# Altium PCB PWM.PcbDoc
Units mil, origin at the board's own origin, x right, y up, seen from the top; angles counter-clockwise.
Board outline 6000 x 4000 mil, 2 copper layers (Top Layer, Bottom Layer); 14 components, 11 nets, 35 pads, 1 vias.
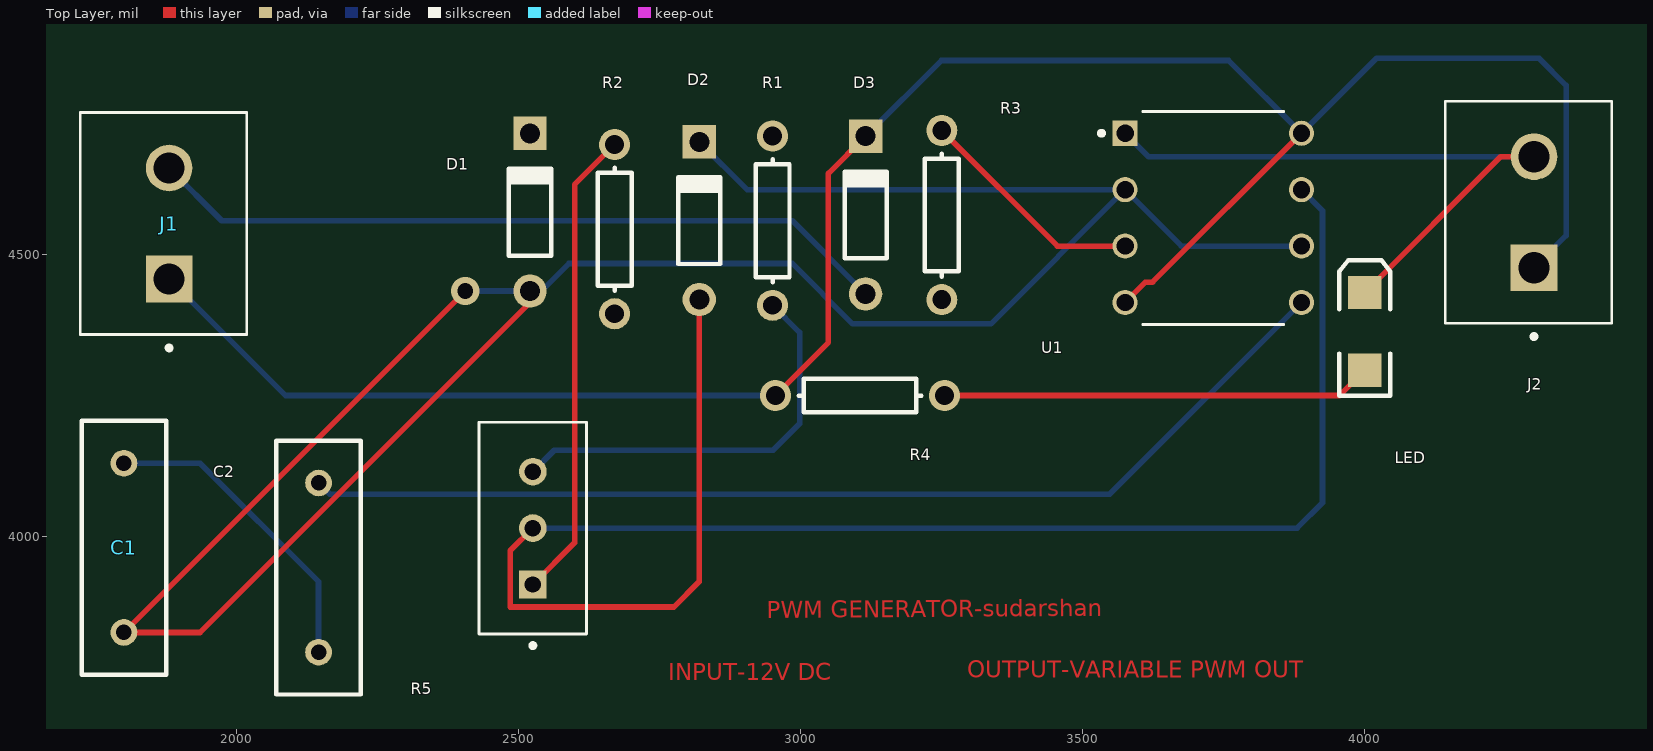
[diagram p0: Top Layer view]
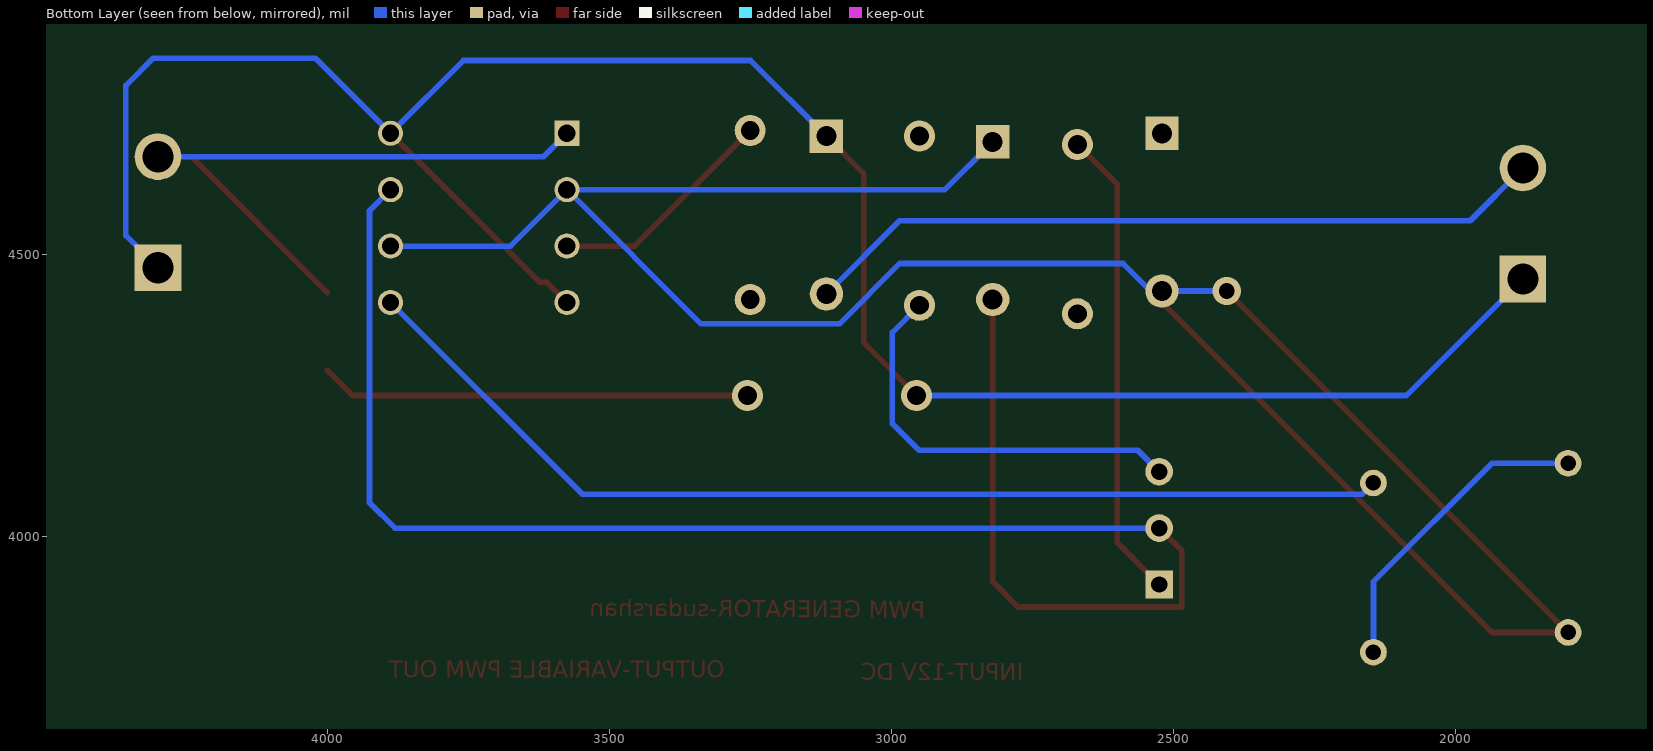
[diagram p1: Bottom Layer view, seen from below]

## Layer stack, top to bottom
Top Solder: solder mask 0.4, Solder Resist, Dk 3.5
Top Layer: signal copper 1.4
Dielectric 1: dielectric 12.6, FR-4, Dk 4.8
Bottom Layer: signal copper 1.4
Bottom Solder: solder mask 0.4, Solder Resist, Dk 3.5

## Board outline
1000,1000 7000,1000 7000,5000 1000,5000

## Design rules (kind name [scope] priority, off if disabled: settings)
Clearance [All] p1: gap=10 ignorepadtopadclearanceinfootprint=FALSE except(0: Arc-Hole Track-Hole SMDPad-Hole THPad-Hole Via-Hole Fill-Hole Poly-Hole Region-Hole Text-Hole)
PolygonConnect [All] p1: connectstyle=Relief reliefconductorwidth=10 reliefentries=4 polygonreliefangle="90 Angle" airgapwidth=10
RoutingVias [All] p1: holewidth=28 width=50 viastyle="Through Hole" minholewidth=28 minwidth=50 maxholewidth=28 maxwidth=50
SilkToSolderMaskClearance [IsPad] p1: minsilkscreentomaskgap=5 clearancetoexposedcopper=TRUE
SolderMaskExpansion [All] p1: expansion=4 istentingtop=FALSE
Width [All] p1: maxlimit=10 minlimit=10 preferedwidth=10
29 further rules are at their usual default settings.

## Components (designator, comment, footprint, x,y, rotation, side; value= is the part's Value field where it differs from the comment)
C1 "Cap" RAD-0.3 1800,3980 r90 top value=47NF
C2 "Cap" RAD-0.3 2145,3945 r90 top value=10UF
D1 "Diode 1N4148" DO-35 2520,4575 r90 top
D2 "Diode 1N4148" DO-35 2820,4560 r90 top
D3 "Diode 1N4148" DO-35 3115,4570 r90 top
J1 "KF301-2P" HANDSON_KF301-2P 1880,4555 r90 top
J2 "KF301-2P" HANDSON_KF301-2P 4300,4575 r90 top
LED "LED2" 3.2X1.6X1.1 4000,4363.9 r90 top
R1 "Res1" AXIAL-0.3 2950,4560 r90 top value=10K
R2 "Res1" AXIAL-0.3 2670,4545 r90 top value=10K
R3 "Res1" AXIAL-0.3 3250,4570 r90 top value=100
R4 "Res1" AXIAL-0.3 3105,4250 r180 top value=2.2K
R5 "3296-W" TRIM_3296-W 2525,3915 r90 top
U1 "NE555P" DIP794W45P254L959H508Q8 3731.3,4565 r0 top

## Footprints (in the part's own frame and the unit in brackets; to place one, negate y for a bottom-side part, rotate by r counter-clockwise, add the part's x,y. Pads: shape width x height; smd on the part's side, far side on the other; paste and mask are expansions set on the pad)
3.2X1.6X1.1 [mm] "SMT LED; 2 Flat Leads"
  rect 1.5x1.5 smd: 1(-1.75,0) 2(1.75,0)
  silkscreen extent -2.9,-1.15 3.2,1.15
AXIAL-0.3 [mm] "Axial Device, Thru-Hole; 2 Leads; 0.3 in Pin Spacing"
  round 1.4 hole 0.85: 1(-3.81,0) 2(3.81,0)
  silkscreen extent -2.77,-0.76 2.77,0.76
DIP794W45P254L959H508Q8 [mm]
  rect 1.13x1.13 / inner round 1.13 / far side rect 1.13x1.13 hole 0.78 mask+0.102: 1(-3.97,3.81)
  round 1.13 hole 0.78 mask+0.102: 2(-3.97,1.27) 3(-3.97,-1.27) 4(-3.97,-3.81) 5(3.97,-3.81) 6(3.97,-1.27) 7(3.97,1.27) 8(3.97,3.81)
  silkscreen extent -5.13,-4.8 3.18,4.8, body extent -4.1,-4.79 4.1,4.79, height 5.08
DO-35 [mm] "Diode, Axial; Body 3.8 x 1.9 mm (LxDia. max), Lead Dia. 0.53 mm (max)"
  round 1.5 hole 0.9: 1(-3.55,0)
  rect 1.5x1.5 hole 0.9: 2(3.55,0)
  silkscreen extent -1.95,-0.95 2.05,0.95
HANDSON_KF301-2P [mm]
  rect 2.1x2.1 / inner round 2.1 / far side rect 2.1x2.1 hole 1.4: 1(-2.5,0)
  round 2.1 hole 1.4: 2(2.5,0)
  silkscreen extent -5.7,-3.5 5,4, body extent -5.6,-3.75 5,3.75, height 10
RAD-0.3 [mm] "Radial Cap, Thru-Hole; 2 Leads; 0.3 in Pin Spacing"
  round 1.2 hole 0.7: 1(-3.81,0) 2(3.81,0)
  silkscreen extent -5.71,-1.91 5.71,1.91
TRIM_3296-W [mm]
  rect 1.248x1.248 / inner round 1.248 / far side rect 1.248x1.248 hole 0.74: 1(0,0)
  round 1.248 hole 0.74: 2(2.54,0) 3(5.08,0)
  silkscreen extent -2.85,-2.41 7.3,2.42, body extent -4.76,-2.41 4.76,2.42, height 11.55

## Part data
C1 C2: "Capacitor", LatestRevisionDate=17-Jul-2002, LatestRevisionNote="Re-released for DXP Platform.", PackageDescription="Radial Cap, Thru-Hole; 2 Leads; 0.3 in Pin Spacing", PackageReference=RAD-0.3, Published=8-Jun-2000, Publisher="Altium Limited"
D1 D2 D3: "High Conductance Fast Diode", Code_JEDEC=DO-204-AH, ComponentLink1Description="Manufacturer Link", ComponentLink1URL=http://www.fairchildsemi.com/, ComponentLink2Description=Datasheet, ComponentLink2URL=http://www.fairchildsemi.com/ds/1N%2F1N4148.pdf, DatasheetVersion=1997, LatestRevisionDate=17-Jul-2002, LatestRevisionNote="Re-released for DXP Platform.", PackageDescription="Diode, Axial; Body 3.8 x 1.9 mm (LxDia. max), Lead Dia. 0.53 mm (max)", PackageReference=DO-35, Published=8-Jun-2000, Publisher="Altium Limited"
J1 J2: "2 Pin Terminal Block 5mm Pitch", Package=None, Check_prices=https://www.snapeda.com/parts/KF301-2P/Handson+Technology/view-part/?ref=eda, MF="Handson Technology", MP=KF301-2P, SnapEDA_Link=https://www.snapeda.com/parts/KF301-2P/Handson+Technology/view-part/?ref=snap
LED: "Typical RED, GREEN, YELLOW, AMBER GaAs LED", LatestRevisionDate=17-Jul-2002, LatestRevisionNote="Re-released for DXP Platform.", PackageDescription="SM LED; 2 Flat Leads", PackageReference=3.2X1.6X1.1, PackageVersion=Feb-2002, Published=8-Jun-2000, Publisher="Altium Limited"
R1 R2 R3 R4: "Resistor", LatestRevisionDate=17-Jul-2002, LatestRevisionNote="Re-released for DXP Platform.", PackageDescription="Axial Device, Thru-Hole; 2 Leads; 0.3 in Pin Spacing", PackageReference=AXIAL-0.3, Published=8-Jun-2000, Publisher="Altium Limited"
R5: "Res Cermet Trimmer 2K Ohm 10% 0.5W(1/2W) 25(Elec)Turns 2.19mm (9.53 X 4.83 X 11.55mm) Pin Thru-Hole Tube", Package="NON STANDARD-3 Bourns", Check_prices=https://www.snapeda.com/parts/3296W/Bourns/view-part/?ref=eda, MF=Bourns, MP=3296W, SnapEDA_Link=https://www.snapeda.com/parts/3296W/Bourns/view-part/?ref=snap
U1: "Single Precision Timer", Package="PDIP-8 Texas", Check_prices=https://www.snapeda.com/parts/NE555P/Texas+Instruments/view-part/?ref=eda, MF="Texas Instruments", MP=NE555P, SnapEDA_Link=https://www.snapeda.com/parts/NE555P/Texas+Instruments/view-part/?ref=snap

## Via types
v1: diameter 50, hole 28, Top Layer to Bottom Layer, 1 vias

## Nets (pads, with @x,y where several pads share a name; then routed paths per layer and width w, separated by ;. In a path a pad name is that pad's centre, name@x,y a point inside that pad or via, vN(x,y) a via of type N, cw(c..) or ccw(c..) an arc to the next point about the centre after c; other vN are vias at no path point)
GND: J2.2 LED.2 U1.1 | length 1141.9
  Top Layer w10: LED.2 4240.63,4673.43 J2.2
  Bottom Layer w10: U1.1 3616.57,4673.43 J2.2
NetC1_1: C1.1 D1.1 D2.2 U1.2 U1.6 | length 4303.6
  Top Layer w10: v1(2405.24,4435.24) C1.1 1934.76,3830 D1.1@2525,4420.24
  Bottom Layer w10: v1(2405.24,4435.24) D1.1 ; D1.1@2525,4420.24 2588.76,4484 2985,4484 3092,4377 3337,4377 U1.2 ; D2.2 2904.76,4615 U1.2 ; U1.6 3675,4515 U1.2
NetC1_2: C1.2 C2.1 | length 557
  Bottom Layer w10: C1.2 1935,4130 2145,3920 C2.1
NetC2_2: C2.2 U1.5 | length 1891.7
  Bottom Layer w10: C2.2 2165,4075 3547.6,4075 U1.5
NetD2_1: D2.1 R5.2 U1.7 | length 2999.6
  Top Layer w10: R5.2 2485,3975 2485,3875 2775,3875 2820,3920 D2.1
  Bottom Layer w10: R5.2 3880,4015 3925,4060 3925,4577.6 U1.7
NetD3_1: D3.1 J1.2 | length 1327.4
  Bottom Layer w10: J1.2 1973.43,4560 2985.24,4560 D3.1
NetLED_1: LED.1 R4.1 | length 763.6
  Top Layer w10: R4.1 3955,4250 LED.1
NetR1_1: R1.1 R5.3 | length 738.1
  Bottom Layer w10: R5.3 2563,4153 2951,4153 2998,4200 2998,4362 R1.1
NetR2_2: R2.2 R5.1 | length 840.1
  Top Layer w10: R5.1 2599,3989 2599,4624 R2.2
NetR3_2: R3.2 U1.3 | length 409.9
  Top Layer w10: R3.2 3455,4515 U1.3
VCC: D3.2 J1.1 J2.1 R4.2 U1.4 U1.8 | length 3896.5
  Top Layer w10: R4.2 3049,4344 3049,4643.76 D3.2 ; U1.4 3611,4451 3623.6,4451 U1.8
  Bottom Layer w10: J1.1 2086.57,4250 R4.2 ; D3.2 3249.24,4844 3758.6,4844 U1.8 4020.6,4848 4309,4848 4357,4800 4357,4533.57 J2.1
pads on no net: D1.2 R1.2 R2.1 R3.1

## Other copper
Top Layer:
  text "PWM GENERATOR-sudarshan" at 2940,3855 h30 r0.35
  text "OUTPUT-VARIABLE PWM OUT" at 3295,3750 h30
  text "INPUT-12V DC" at 2765,3745 h30

## Silkscreen, mask and mechanical layers (free items; w line width, h text height)
Mechanical 1:
  lines w10: 1730,4885 1665,4885 ; 1665,4885 4440,4885 4605,4720 4605,4350 3905,3650 1770,3650 1505,3915 1505,4725 1665,4885